# Allegro board mib_fp_ethernet_07.brd
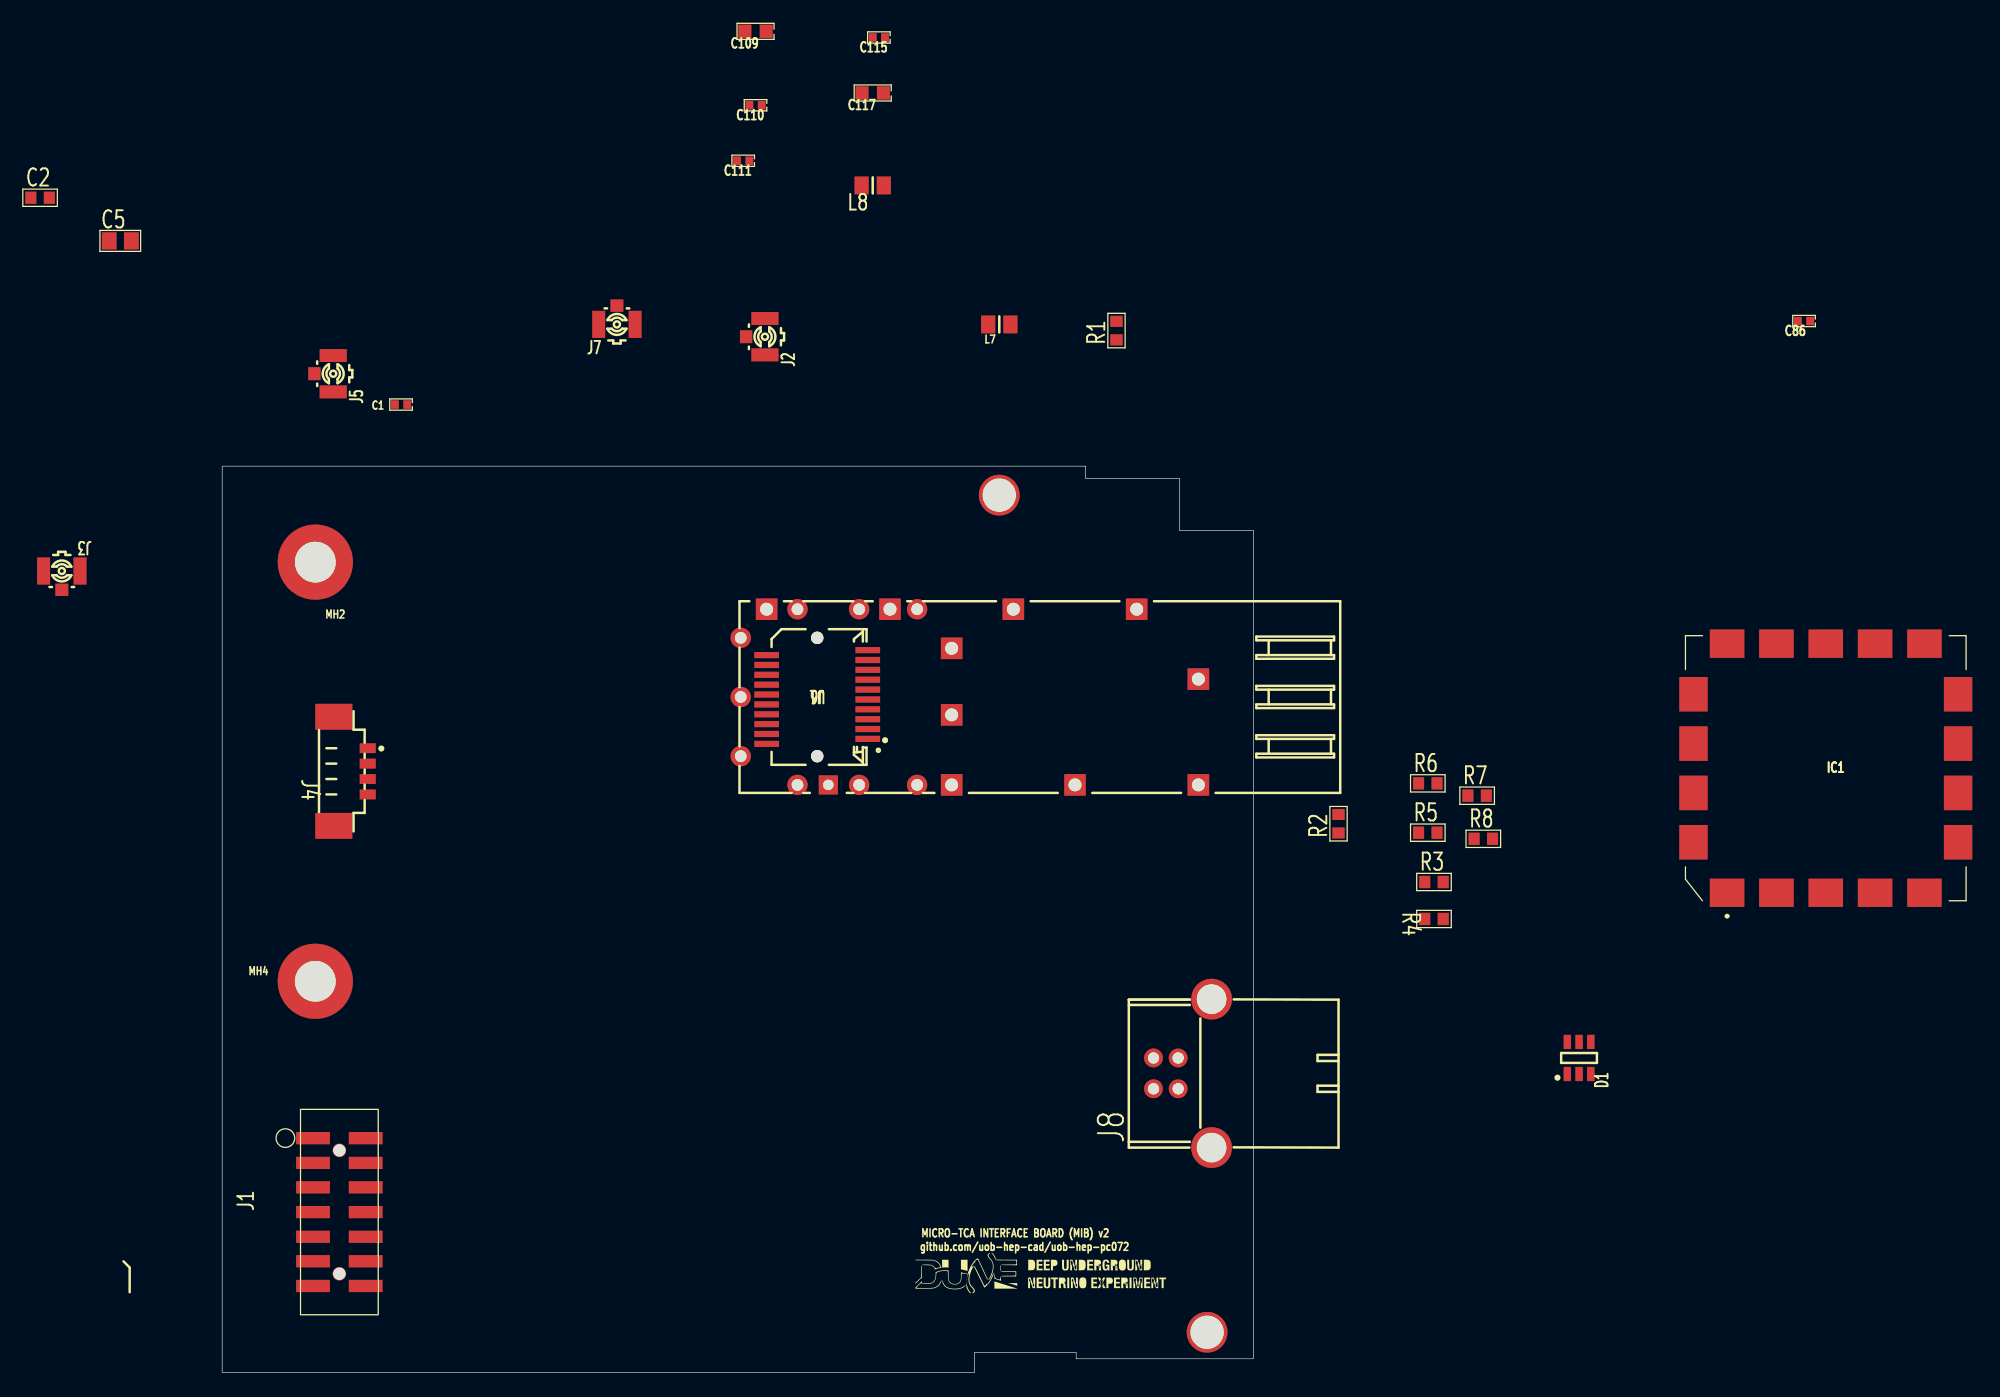
[diagram p0: board, top side]
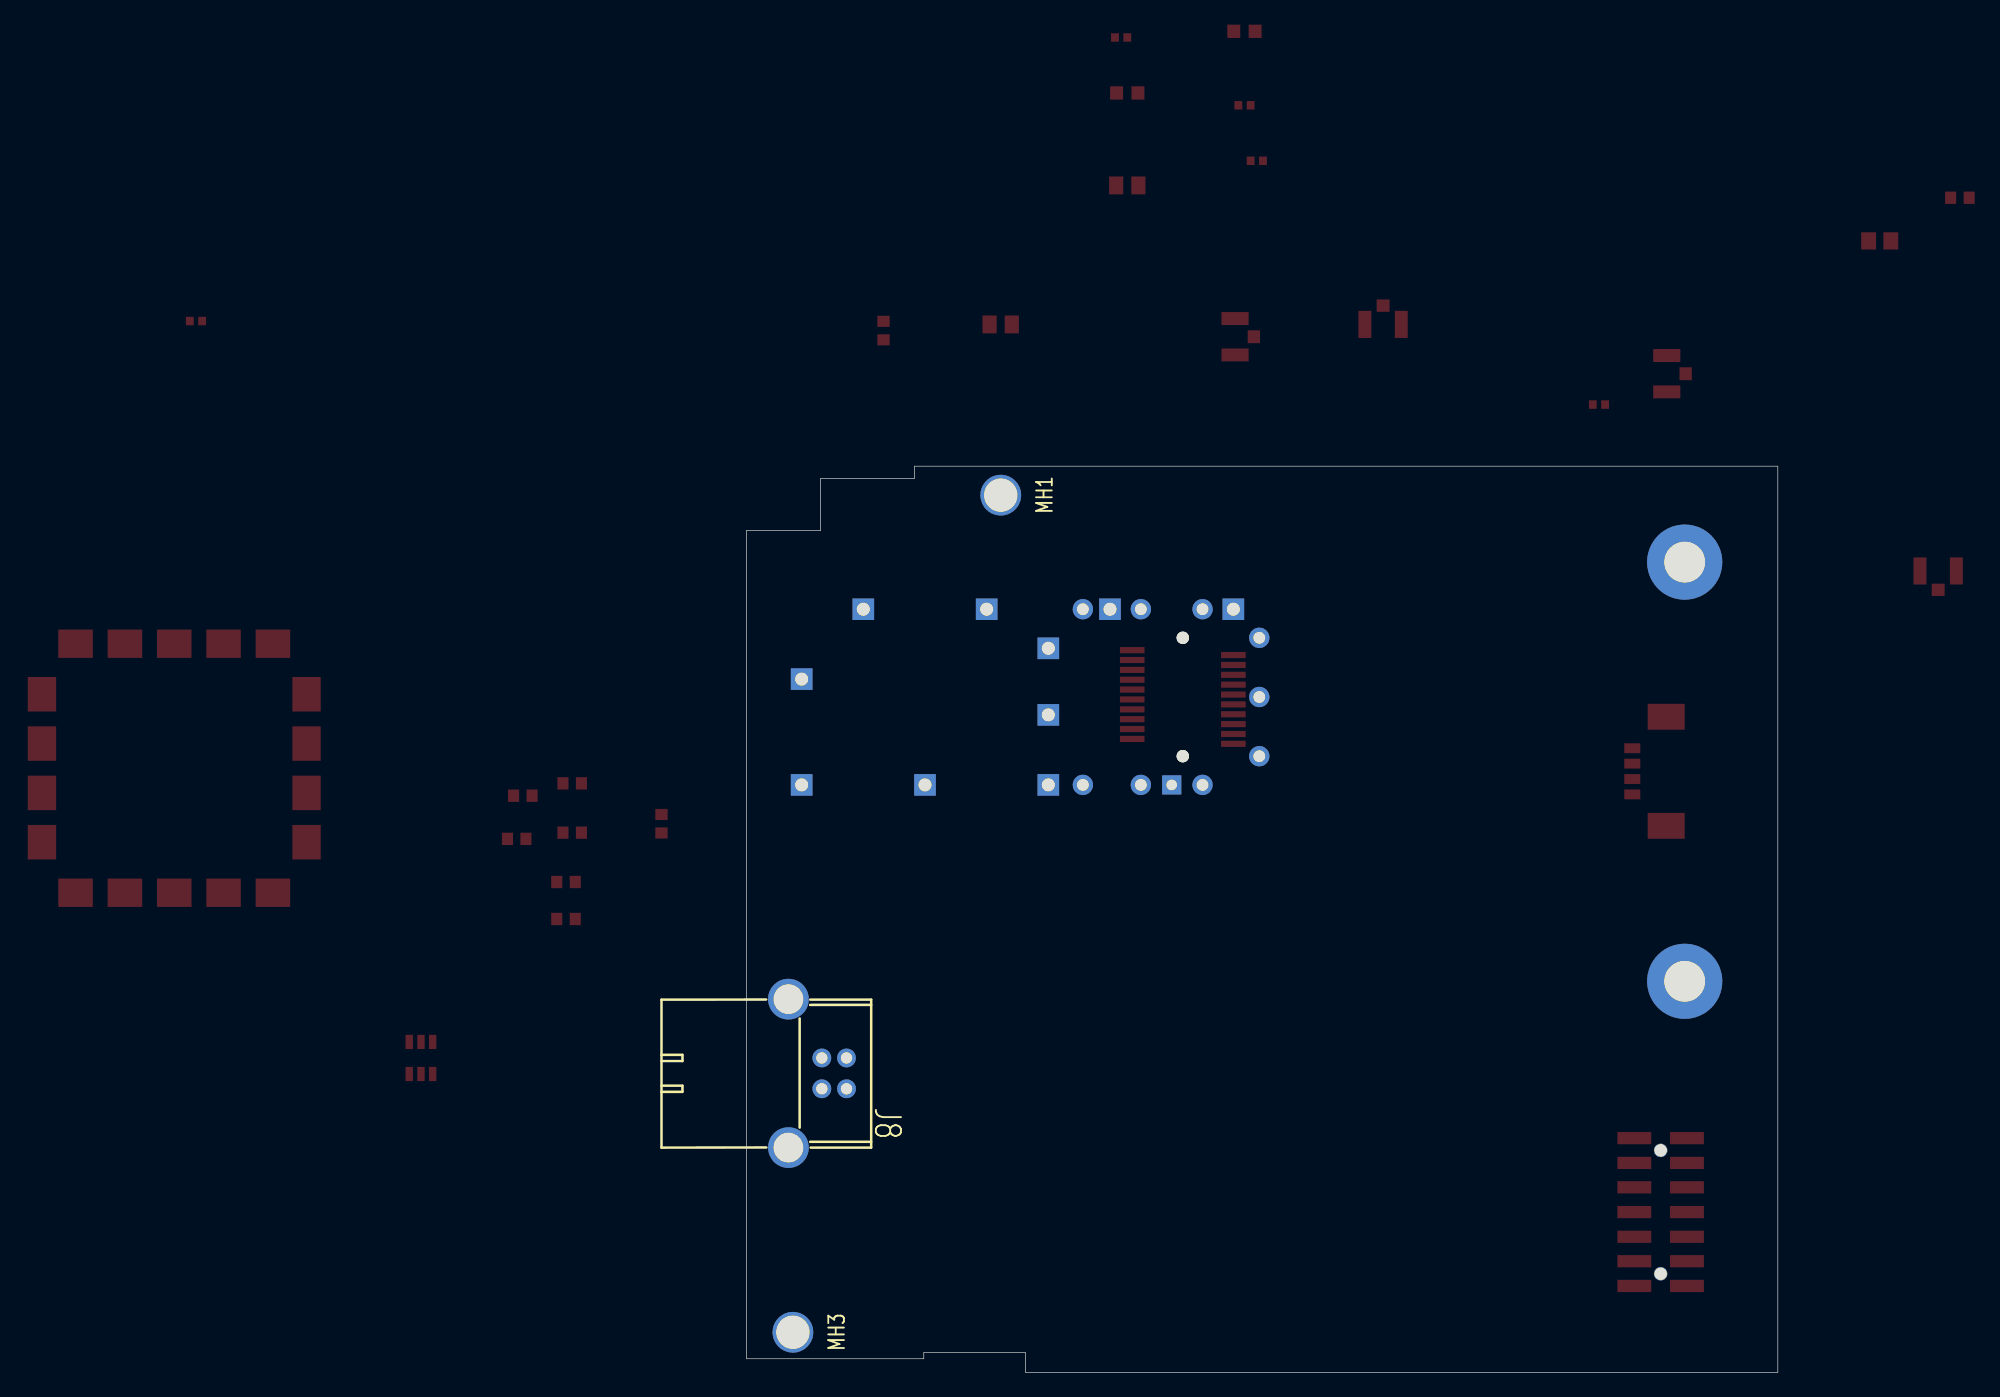
[diagram p1: board, bottom side, seen from below]

Outline 83.59 x 73.5 mm; copper layers: TOP, 02_GND, 03_VCC, BOTTOM. Coordinates in mm from the lower left corner of the outline.
Outline path: 0,73.5 70,73.5 70,72.5 77.59,72.5 77.59,68.3 83.59,68.3 83.59,1.1 69.24,1.1 69.24,1.6 61,1.6 61,0 0,0 0,73.5

## Design rules (mm)
constraint set DEFAULT: min track width 0.127

## Placement (name value [footprint] x y rotation side)
C1  0.1UF  [CAP0402]  14.5 78.5 0 top
C2  100nF  [C0603]  -14.76 95.27 0 top
C5  10uF  [C0805]  -8.26 91.77 0 top
C86  0.1UF  [CAP0402]  128.24 85.27 0 top
C109  22UF  [CAP0603]  43.24 108.77 0 top
C110  1UF  [CAP0402]  43.24 102.77 0 top
C111  0.1UF  [CAP0402]  42.24 98.27 0 top
C115  0.1UF  [CAP0402]  53.24 108.27 0 top
C117  22UF  [CAP0603]  52.74 103.77 0 top
D1  -  [SOT95P280X145-6N]  110 25.5 90 top
IC1  -  [410357B]  130 49 0 top
J1  7X2RECPT_SMD_2MM  [HDR14PINSMD]  9.5 13 90 top
J2  -  [HIROSE_U-FL-R-SMT-1_10]  44 84 90 top
J3  -  [HIROSE_U-FL-R-SMT-1_10]  -13 65 180 top
J4  -  [MOLEX_53398-0471]  10 50 270 top
J5  -  [HIROSE_U-FL-R-SMT-1_10]  9 81 90 top
J6  1367073-1  [TYCO_1367073]  48.24 54.77 180 top
J7  -  [HIROSE_U-FL-R-SMT-1_10]  32 85 0 top
J8  -  [JACK12X17_USB4B]  75.5 25.5 90 top
L7  1 UH  [INDC2013X105N]  63 85 0 top
L8  1 UH  [INDC2013X105N]  52.74 96.27 0 top
MH1  MT_HOLE  [MOUNTHOLE]  63 71.15 180 bottom
MH2  MT_HOLE  [MOUNTHOLE]  7.55 65.72 0 top
MH3  MT_HOLE  [MOUNTHOLE]  79.84 3.25 180 bottom
MH4  MT_HOLE  [MOUNTHOLE]  7.55 31.72 0 top
NOREF  -  []  56.2 6.4 0 top
NOREF#2  -  []  61 0.73 0 top
NOREF#3  -  []  -97 0 0 top
NOREF#4  -  []  60.37 0 90 top
NOREF#5  -  []  81.31 68.3 90 top
NOREF#6  -  []  70 73.04 0 top
R1  4.7k  [C0603]  72.5 84.5 90 top
R2  10k  [C0603]  90.5 44.5 90 top
R3  4.7k  [C0603]  98.24 39.77 0 top
R4  4.7k  [C0603]  98.24 36.77 0 top
R5  4.7k  [C0603]  97.74 43.77 0 top
R6  4.7k  [C0603]  97.74 47.77 0 top
R7  4.7k  [C0603]  101.74 46.77 0 top
R8  4.7k  [C0603]  102.24 43.27 0 top
U1  2227023-1  [SFP_CAGE]  48.24 54.77 180 top

## Library data of the parts
C1 = CAP_NP: Tolerance: TOL?; User Part Number: 445-7348-2-ND; part number: CAP_NP-445-7348-2-ND,CAP_NP; room: JTAG
C2 = CAPCERSMDCL2: part number: CAPCERSMDCL2_0603-100NF,16V; tolerance: 10%
C5 = CAPCERSMDCL2: part number: CAPCERSMDCL2_0805-10UF,16V_GEN; tolerance: 10%
C86 C111 C115 = CAP_NP: Tolerance: TOL?; User Part Number: 445-7348-2-ND; part number: CAP_NP-445-7348-2-ND,CAP_NP; room: SFP0
C109 C117 = CAP_NP: Tolerance: TOL?; User Part Number: GRM188R60J226MEA0D; part number: CAP_NP-GRM188R60J226MEA0D,CAP_NP; room: SFP0
C110 = CAP_NP: Tolerance: TOL?; User Part Number: GRT155R61E105ME01D; part number: CAP_NP-GRT155R61E105ME01D,CAP_NP; room: SFP0
D1 = USBLC6-2: part number: USBLC6-2SC6
IC1 = 410_357_B: part number: 410_357_B-DIGILENT,410-357-B
J1 = 7X2RECPT_SMD_2MM: User Part Number: 878321420; part number: 7X2RECPT_SMD_2MM-878321420,7X2RECPT_SMD_2MM; room: JTAG
J2 J3 J5 J7 = PCOAX: part number: PCOAX-U.FL-R-SMT-1(10)
J4 = CON4P: part number: CON4P-53398-0471
J6 = CON20P_SFP-1367073-1: part number: CON20P_SFP-1367073-1-1367073-1,CON20P_SFP-1367073-1; room: SFP0
J8 = CON4P: part number: CON4P-67068-8001
L7 L8 = IND: part number: IND-CIGT201208EH1R0MNE,IND
MH1 MH2 = MT_HOLE: part number: MT_HOLE-MT_HOLE,MT_HOLE; room: TE0712
MH3 MH4 = MT_HOLE: part number: MT_HOLE-MT_HOLE,MT_HOLE
R1 R3-R8 = RSMD0603: part number: RSMD0603_1/10W-4.7K,1%; tolerance: 1%
R2 = RSMD0603: part number: RSMD0603_1/10W-10K,1%; tolerance: 1%
U1 = SFP_CAGE-2227023-1: part number: SFP_CAGE-2227023-1-2227023-1,SFP_CAGE-2227023-1; room: SFP0

## Footprints (pads in the part's own frame, mm; a bottom-side part is the same pattern mirrored in y, then rotated)
410357B
  rect 2.8x2.3 smd: 1(-8,-10.1) 2(-4,-10.1) 3(0,-10.1) 4(4,-10.1) 5(8,-10.1) 10(8,10.1) 11(4,10.1) 12(0,10.1) 13(-4,10.1) 14(-8,10.1)
  rect 2.3x2.8 smd: 6(10.725,-6) 7(10.725,-2) 8(10.725,2) 9(10.725,6) 15(-10.725,6) 16(-10.725,2) 17(-10.725,-2) 18(-10.725,-6)
C0603
  rect 0.9x1 smd: 1(-0.75,0) 2(0.75,0)
C0805
  rect 1.2x1.4 smd: 1(-0.9,0) 2(0.9,0)
CAP0402
  rect 0.635x0.686 smd: 1(-0.499,0) 2(0.499,0)
CAP0603
  rect 1.05x1.08 smd: 1(-0.865,0) 2(0.865,0)
HDR14PINSMD
  round 1.092 hole 0.991 unplated: (-5.004,0) (5.004,0)
  rect 0.991x2.743 smd: 1(5.994,2.134) 2(5.994,-2.134) 3(3.988,2.134) 4(3.988,-2.134) 5(2.007,2.134) 6(2.007,-2.134) 7(0,2.134) 8(0,-2.134) 9(-2.007,2.134) 10(-2.007,-2.134) 11(-3.988,2.134) 12(-3.988,-2.134) 13(-5.994,2.134) 14(-5.994,-2.134)
HIROSE_U-FL-R-SMT-1_10
  rect 1.05x1 smd: 1(0,1.525)
  rect 1.05x2.2 smd: 2(-1.475,0) 3(1.475,0)
INDC2013X105N
  rect 1.15x1.45 smd: 1(-0.9,0) 2(0.9,0)
JACK12X17_USB4B
  round 1.524 hole 0.914: 1(0,0) 2(-2.5,0) 3(-2.5,-2) 4(0,-2)
  round 3.302 hole 2.4: 5(-7.27,-4.71) 6(4.77,-4.71)
MOLEX_53398-0471
  rect 2.1x3 smd: (-3.175,-0.95) (5.675,-0.95)
  rect 0.8x1.3 smd: 1(-0.625,1.8) 2(0.625,1.8) 3(1.875,1.8) 4(3.125,1.8)
MOUNTHOLE
  round 6.096 hole 3.302: 1(0,0)
SFP_CAGE
  rect 1.75x1.75 hole 1.05: 1(-30.9,7.125) 2(-20.9,7.125) 3(-10.9,7.125) 5(-25.9,-7.125) 6(-15.9,-7.125) 7(-5.9,-7.125) 8(4.1,-7.125) 9(-30.9,-1.455) 10(-10.9,1.445) 11(-10.9,-3.955)
  rect 1.55x1.55 hole 0.85: 4(-0.9,7.125)
  round 1.65 hole 0.95: 12(-8.1,7.125) 13(-3.4,7.125) 14(1.6,7.125) 15(-8.1,-7.125) 16(-3.4,-7.125) 17(1.6,-7.125) 18(6.2,-4.805) 19(6.2,-0.005) 20(6.2,4.796)
SOT95P280X145-6N
  rect 1.15x0.6 smd: 1(-1.3,0.95) 2(-1.3,0) 3(-1.3,-0.95) 4(1.3,-0.95) 5(1.3,0) 6(1.3,0.95)
TYCO_1367073
  round 1 hole 1.55 unplated: (0,4.795) (0,-4.805)
  rect 2x0.5 smd: 1(-4.1,3.395) 2(-4.1,2.595) 3(-4.1,1.795) 4(-4.1,0.995) 5(-4.1,0.195) 6(-4.1,-0.605) 7(-4.1,-1.405) 8(-4.1,-2.205) 9(-4.1,-3.005) 10(-4.1,-3.805) 11(4.1,-3.405) 12(4.1,-2.605) 13(4.1,-1.805) 14(4.1,-1.005) 15(4.1,-0.205) 16(4.1,0.595) 17(4.1,1.395) 18(4.1,2.195) 19(4.1,2.995) 20(4.1,3.795)

## Nets
GND: C1.2 C2.1 C5.1 C86.2 C109.2 C110.2 C111.2 C115.2 C117.2 D1.2 IC1.1 IC1.7 IC1.14 J1.1 J1.3 J1.5 J1.7 J1.9 J1.11 J2.2 J2.3 J3.2 J3.3 J4.1 J5.2 J5.3 J6.1 J6.9 J6.10 J6.11 J6.14 J6.17 J6.20(VEET2) J7.2 J7.3 J8.4(A<3>) J8.5 J8.6 MH1.1(MH_SIG) MH2.1(MH_SIG) MH3.1(MH_SIG) MH4.1(MH_SIG) R2.1 R4.1 U1.1 U1.2 U1.3 U1.4 U1.5 U1.6 U1.7 U1.8 U1.9 U1.10 U1.11 U1.12 U1.13 U1.14 U1.15 U1.16 U1.17 U1.18 U1.19(CG_9) U1.20
P5V: C2.2(B<0>) D1.5(VBUS) J8.1 R1.2(B<0>)
VCC3V3: C5.2(B<0>) C86.1 IC1.2 IC1.15 J4.3 L7.1 L8.2 R3.2(B<0>) R5.2(B<0>) R6.2(B<0>) R7.2(B<0>) R8.2(B<0>)
VCCR_3V3: C109.1 C110.1 C111.1 J6.15 L7.2
VCCT_3V3: C115.1 C117.1 J6.16 L8.1
LOS: J6.8 R8.1
RATE_SELECT: J6.7 R3.1
RD_N: J6.12 J7.1(A)
RD_P: J5.1(A) J6.13
SCL: J6.5 R5.1
SDA: J6.4 R6.1
TCK: IC1.10 J1.6
TD_N: J3.1(A) J6.19
TD_P: J2.1(A) J6.18
TDI: IC1.12 J1.10
TDO: IC1.11 J1.8
TMS: IC1.13 J1.4
TX_DISABLE: J6.3 R4.2(B<0>)
TX_FAULT: J6.2 R7.1
UART_RX_TO_FPGA_3V3: IC1.6 J4.2
UART_TX_FROM_FPGA_3V3: IC1.5 J4.4(A<3>)
UNNAMED_1_410357B_I128_USBDM: D1.6 IC1.16
UNNAMED_1_410357B_I128_USBDP: D1.4 IC1.17
UNNAMED_1_410357B_I128_VBUSDETE: IC1.18 R1.1 R2.2(B<0>)
UNNAMED_1_CON4P_I129_A: D1.1 J8.2
UNNAMED_1_CON4P_I129_A_1: D1.3 J8.3
VREF_JTAG: C1.1 IC1.8(VREF_JTAG) J1.2

Pads without a net: IC1 3 4 9; J1 12 13 14; J6 6

## Copper pours and planes (outline as drawn; the poured copper is in the pictures)
GND on 02_GND: 60.36,0.64 0.5,0.64 0.5,72.86 69.36,72.86 69.36,71.86 76.96,71.86 76.96,67.67 82.96,67.67 82.96,1.74 69.87,1.74 69.87,2.23 60.36,2.23 ; 1 cut-out
VCC3V3 on 03_VCC: 60.36,0.64 0.5,0.64 0.5,72.86 69.36,72.86 69.36,71.86 76.96,71.86 76.96,67.67 82.96,67.67 82.96,1.74 69.87,1.74 69.87,2.23 60.36,2.23

## Text on the board
Ref Des/Silkscreen Top: github.com/uob-hep-cad/uob-hep-pc072 | MICRO-TCA INTERFACE BOARD (MIB) v2
User.45: 1. BOARD THICKNESS: 1.57mm | 2. MATERIAL: FR4 (RoHS COMPLIANT MATERIAL) OR EQUIVALENT. GLASS | 3. ALL HOLES ARE PLATED THROUGH UNLESS OTHERWISE NOTED | 5. ALL TOLERANCES +/-3MILS EXCEPT WHERE NOTED | MICRO-TCA INTERFACE BOARD (MIB) front panel ethernet DB
